# Altium PCB usb_c_meter.PcbDoc
Units mm, origin at the board's own origin, x right, y up, seen from the top; angles counter-clockwise.
Board outline 50.85 x 29.85 mm, 2 copper layers (Top Layer, Bottom Layer); 39 components, 23 nets, 172 pads, 24 vias.
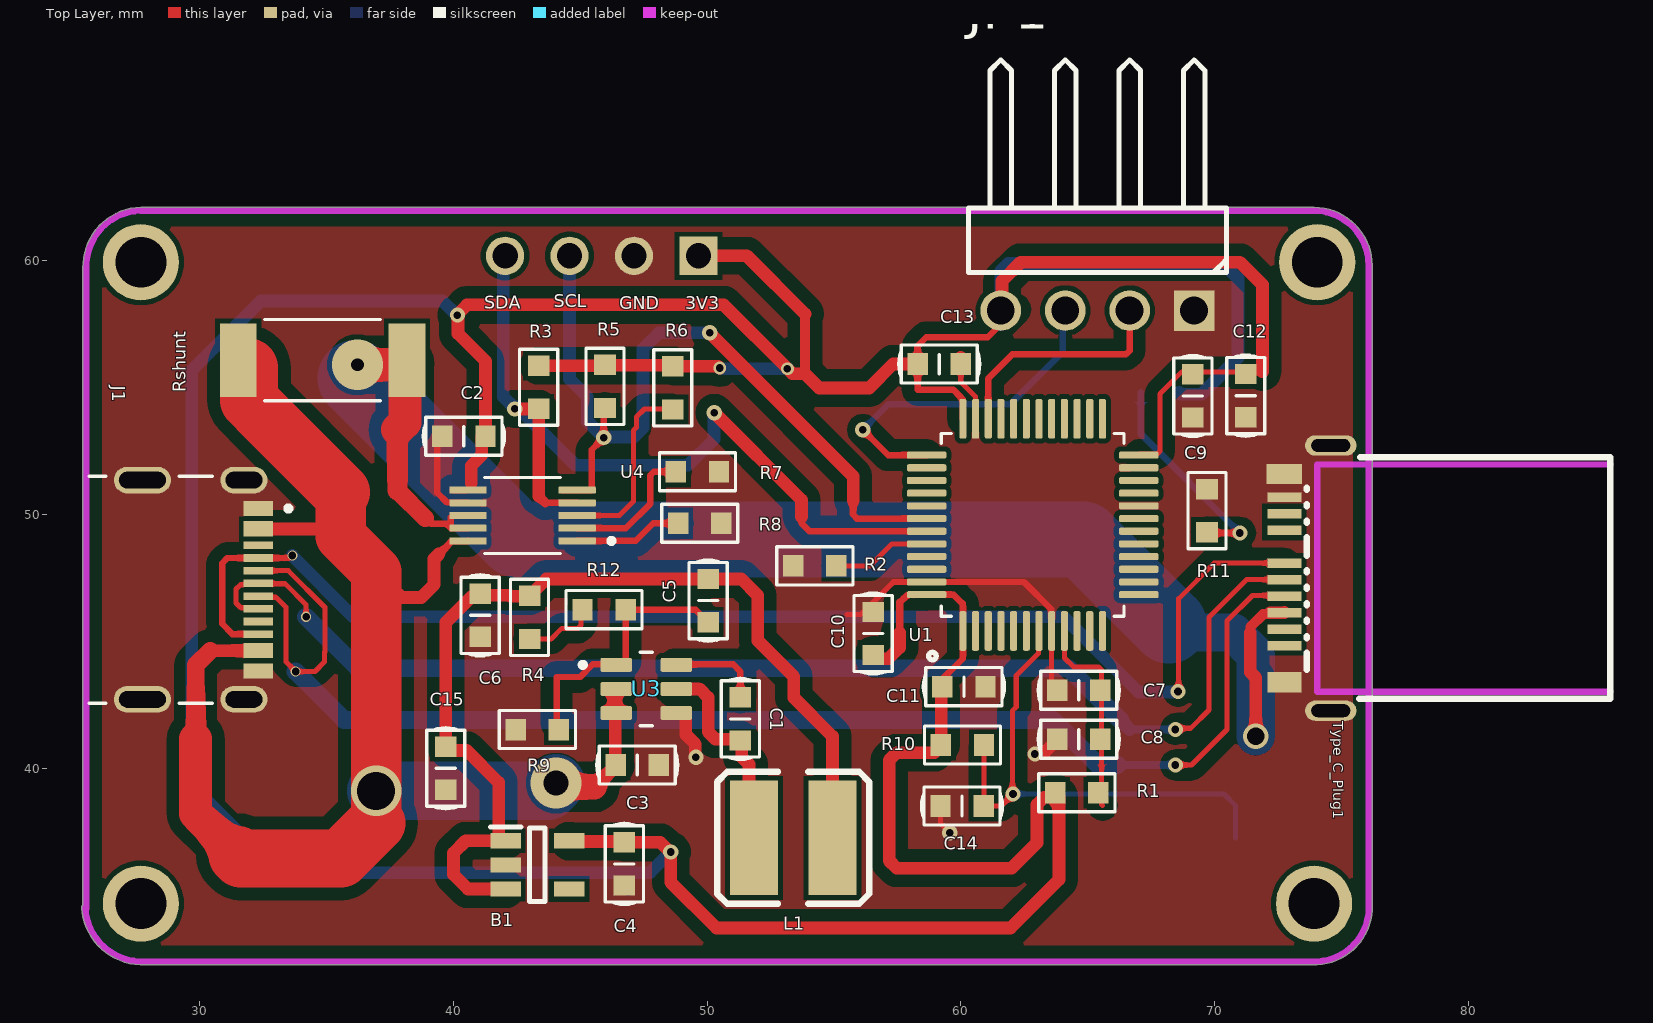
[diagram p0: Top Layer view]
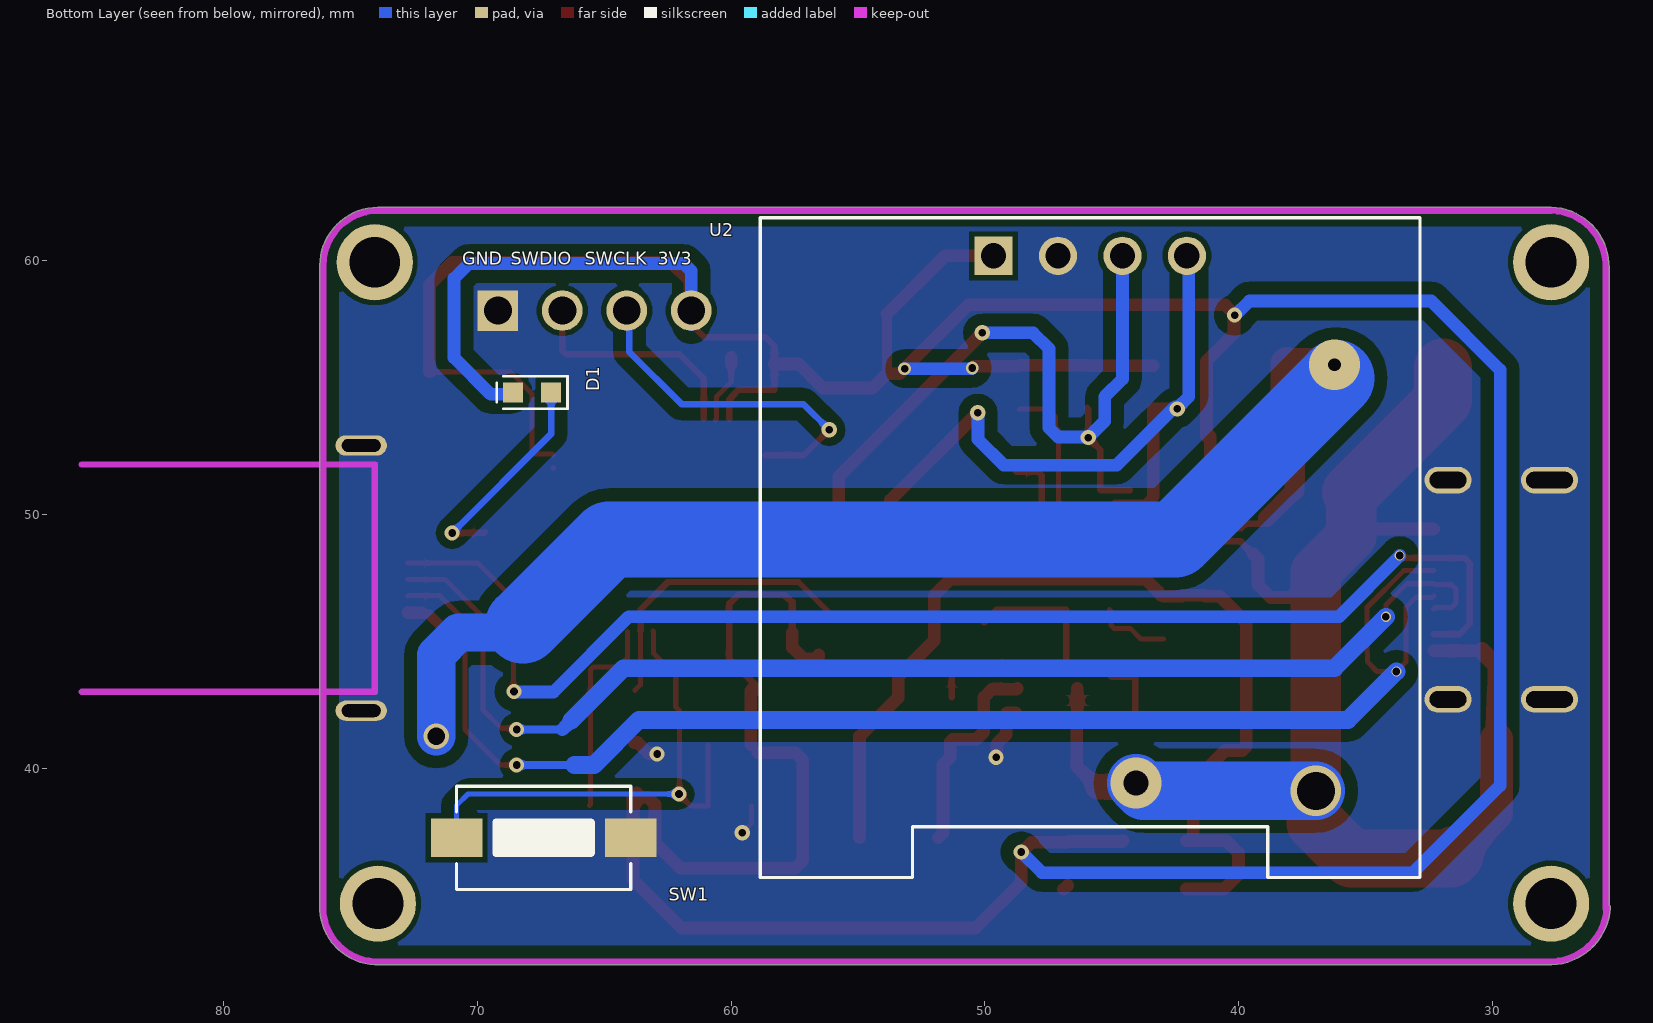
[diagram p1: Bottom Layer view, seen from below]
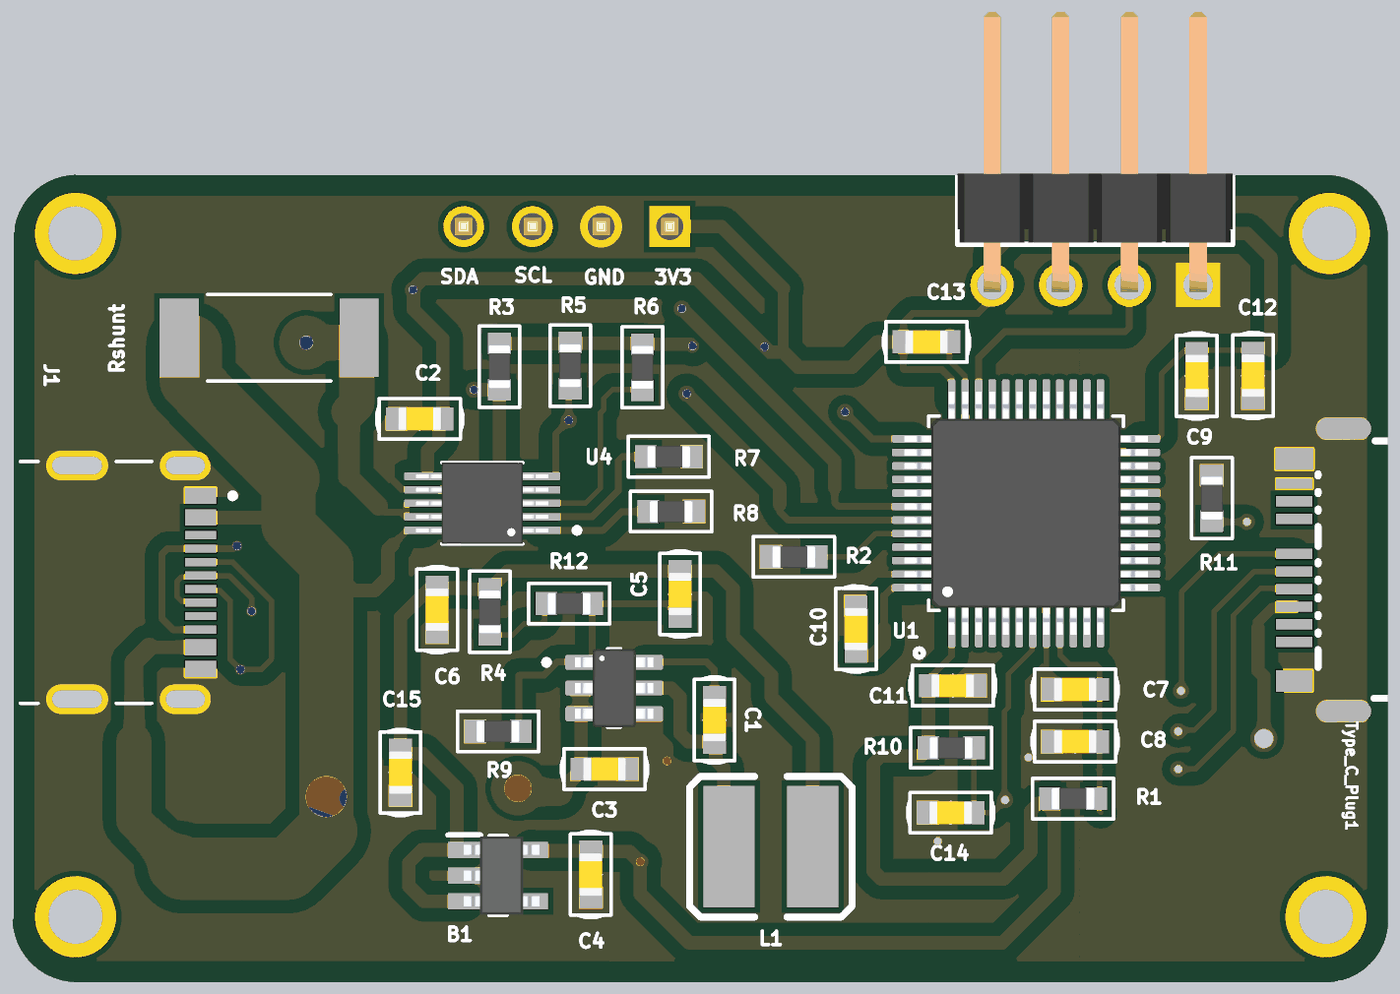
[diagram p2: 3D render of the assembled board from above, using the file's embedded part models]
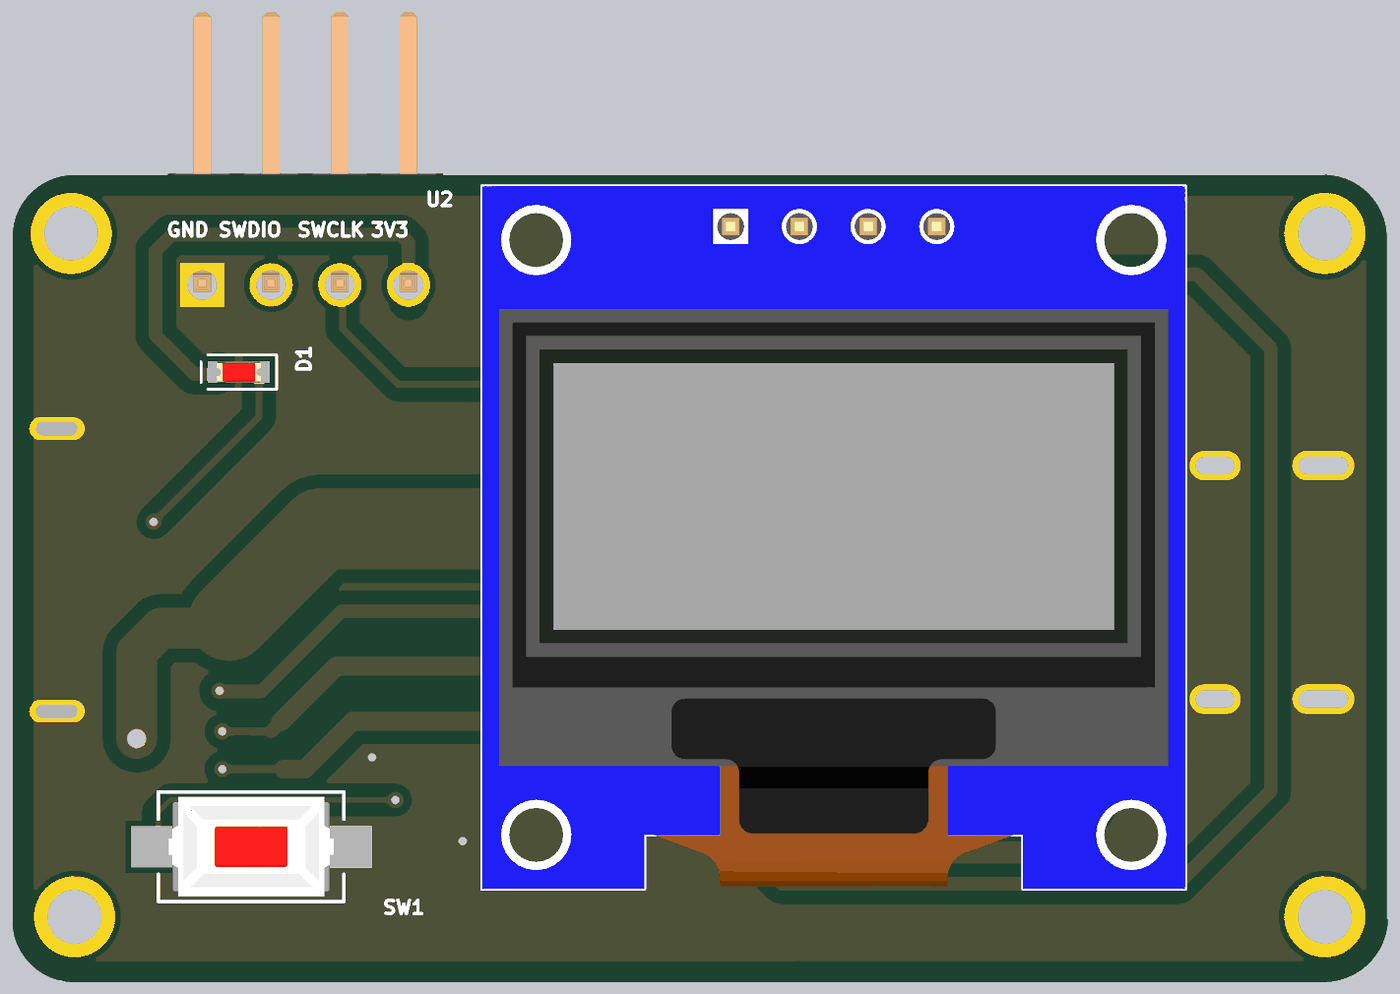
[diagram p3: 3D render of the assembled board from below, using the file's embedded part models]

## Layer stack, top to bottom
Top Solder: solder mask 0.0102, Solder Resist, Dk 3.5
Top Layer: signal copper 0.0356
Dielectric 1: dielectric 0.32, FR-4, Dk 4.8
Bottom Layer: signal copper 0.0356
Bottom Solder: solder mask 0.0102, Solder Resist, Dk 3.5

## Board outline
25.36,34.49 cw(c25.484,34.516) 25.4,34.611 25.4,59.69 25.401,59.71 cw(c27.746,59.766) 27.682,62.11 27.728,62.103 73.913,62.103 cw(c73.913,59.816) 76.2,59.816 76.2,34.458 76.207,34.409 cw(c73.921,34.544) 74.048,32.258 74.041,32.258 27.659,32.259 27.655,32.259 cw(c27.736,34.639)

## Design rules (kind name [scope] priority, off if disabled: settings)
BoardOutlineClearance [All] p1 off: gap=0.254 ignorepadtopadclearanceinfootprint=FALSE except(0: Arc-SplitContinuation Track-SplitContinuation SMDPad-SplitContinuation THPad-SplitContinuation Via-SplitContinuation Fill-SplitContinuation Poly-SplitContinuation Region-SplitContinuation Text-SplitContinuation)
Clearance Clearance_3 [InPolygon And InNet('GND') vs InComponent('U1')] p1: gap=0.2 ignorepadtopadclearanceinfootprint=FALSE
Clearance Clearance_2 [InPolygon And InNet('GND') vs InNet('3V3') And Not IsPad] p2: gap=0.5 ignorepadtopadclearanceinfootprint=FALSE
Clearance Clearance_1 [InPolygon And InNet('GND') vs InNet('+5') And Not IsPad] p3: gap=0.5 ignorepadtopadclearanceinfootprint=FALSE
Clearance [All] p4: gap=0.2 ignorepadtopadclearanceinfootprint=FALSE except(0.5: Track-Poly)
DiffPairsRouting [All] p1: maxlimit=0.6 minlimit=0.2 mostfreqgap=0.4 toplayer_minwidth=0.2 toplayer_maxwidth=0.2 toplayer_prefwidth=0.2 bottomlayer_minwidth=0.2 bottomlayer_maxwidth=0.2 bottomlayer_prefwidth=0.2 maxuncoupledlength=12.7
MinimumSolderMaskSliver [All] p1: minsoldermaskwidth=0.015
PlaneConnect [All] p1: planeconnectstyle=Direct reliefexpansion=0.508 reliefentries=4 reliefconductorwidth=0.254 reliefairgap=0.254
PolygonConnect [All] p1: connectstyle=Direct reliefconductorwidth=0.254 reliefentries=4 polygonreliefangle="90 Angle" airgapwidth=0.254
RoutingVias [All] p1: holewidth=0.3 width=0.6 viastyle="Through Hole" minholewidth=0.3 minwidth=0.6 maxholewidth=0.3 maxwidth=0.6
SilkToSolderMaskClearance [IsPad] p1: minsilkscreentomaskgap=0.1 clearancetoexposedcopper=TRUE
SolderMaskExpansion [All] p1: expansion=0.02 istentingtop=FALSE
Width signal [All] p1 off: maxlimit=0.5 minlimit=0.2 preferedwidth=0.35 minimp=50.000000 maximp=50.000000 favimp=50.000000
Width [All] p2 off: maxlimit=0.5 minlimit=0.2 preferedwidth=0.253 minimp=50.000000 maximp=50.000000 favimp=50.000000
Width bus [All] p3: maxlimit=3 minlimit=0.2 preferedwidth=1.3 minimp=50.000000 maximp=50.000000 favimp=50.000000
26 further rules are at their usual default settings.

## Components (designator, comment, footprint, x,y, rotation, side; value= is the part's Value field where it differs from the comment)
B1 "MIC5219-3.3YM5-TR" SOT95P280X145-5N 43.307,36.195 r0 top
C1 "100nF" "C 0603" 51.308,41.949 r270 top
C2 "104" "C 0603" 40.411,53.086 r180 top
C3 "10uF" "C 0603" 47.244,40.132 r0 top
C4 "2.2nF" "C 0603" 46.736,36.234 r270 top
C5 "100pF" "C 0603" 50.038,46.609 r270 top
C6 "22uF" "C 0603" 41.055,46.03 r270 top
C7 "100nF" "C 0603" 64.643,43.078 r180 top
C8 "1nF" "C 0603" 64.643,41.148 r180 top
C9 "100nF" "C 0603" 69.139,54.674 r90 top
C10 "100nF" "C 0603" 56.54,45.314 r90 top
C11 "100nF" "C 0603" 60.118,43.221 r0 top
C12 "100nF" "C 0603" 71.222,54.686 r270 top
C13 "10nF" "C 0603" 59.147,55.933 r0 top
C14 "100nF" "C 0603" 60.044,38.517 r180 top
C15 "22uF" "C 0603" 39.7,40.005 r270 top
D1 "Led" "Led 0603 - red" 67.843,54.813 r180 bottom
J1 "GT-USB-7010B" G-SWITCH_GT-USB-7010B 27.746,47.039 r270 top
JP1 "JP 1x4 2.54" "JP 1x4 DC" 60.3,60.579 r180 top
L1 "CD43-10uH" IND-SMD_L4.5-W4.0 53.391,37.262 r0 top
R1 "0" "R 0603" 64.567,39.04 r180 top
R2 "10K" "R 0603" 54.243,47.981 r0 top
R3 "10K" "R 0603" 43.358,55.016 r270 top
R4 "100K" "R 0603" 43.002,45.949 r90 top
R5 "10K" "R 0603" 45.974,55.054 r270 top
R6 "10K" "R 0603" 48.643,54.993 r270 top
R7 "10K" "R 0603" 49.618,51.689 r180 top
R8 "10K" "R 0603" 49.706,49.657 r180 top
R9 "30k" "R 0603" 43.307,41.529 r0 top
R10 "10k" "R 0603" 60.059,40.919 r180 top
R11 "1K" "R 0603" 69.698,50.153 r90 top
R12 "51K" "R 0603" 45.937,46.253 r180 top
Rshunt "0.01" RES_ERJU1TF4700U 34.846,56.083 r180 top
SW1 "Button" SW/2/SMD 67.386,37.262 r180 bottom
Type_C_Plug1 "GT-USB-8016A" USB-TYPE-C-SMD_GT-USB-8016A 73.66,47.498 r90 top
U1 "STM32F103C8T6" QFP50P900X900X160-48N 62.827,49.594 r90 top
U2 "DM-OLED096-636" MODULE_DM-OLED096-636 45.847,48.698 r180 bottom
U3 "AP63201WU-7" SOP95P280X100-6N 47.6,43.129 r0 top
U4 "INA226AIDGSR" SOP50P490X110-10N 42.725,49.964 r180 top

## Footprints (in the part's own frame and the unit in brackets; to place one, negate y for a bottom-side part, rotate by r counter-clockwise, add the part's x,y. Pads: shape width x height; smd on the part's side, far side on the other; paste and mask are expansions set on the pad)
"C 0603" [mm] "Chip Capacitor, 2-Leads, Body 1.6x0.8mm, IPC Medium Density"
  rect 0.8x0.85 smd: 1(-0.85,0) 2(0.85,0)
  silkscreen extent -1.6,-0.75 1.6,0.75, body extent -0.8,-0.43 0.8,0.43, height 0.81
G-SWITCH_GT-USB-7010B [mm]
  rect 0.6x1.15 smd mask+0.05: A1_B12(-3.2,4.565) A4_B9(-2.4,4.565) B1_A12(3.2,4.565) B4_A9(2.4,4.565)
  rect 0.3x1.15 smd mask+0.05: A5(-1.25,4.565) A6(-0.25,4.565) A7(0.25,4.565) A8(1.25,4.565) B5(1.75,4.565) B6(0.75,4.565) B7(-0.75,4.565) B8(-1.75,4.565)
  oval 1.05x1.85 hole 0.65 slot 1.45 at 90 deg: SH1(-4.32,4) SH2(4.32,4)
  oval 1.05x2.25 hole 0.65 slot 1.85 at 90 deg: SH3(-4.32,0) SH4(4.32,0)
  silkscreen extent -4.47,-2.1 4.47,5.85
IND-SMD_L4.5-W4.0 [mil]
  rect 74.8x177.2 smd: 1(-61,0) 2(61,0)
  silkscreen extent -118,-102 118,102
"JP 1x4 DC" [mm] "4 pins, 1 row, right angled, gold plating"
  rect 1.6x1.6 hole 1.1: 1(-8.89,2.54)
  round 1.6 hole 1.1: 2(-6.35,2.54) 3(-3.81,2.54) 4(-1.27,2.54)
  silkscreen extent -10.16,-7.34 0,1.04, body extent -10.16,-7.57 0,2.79, height 2.54
"Led 0603 - red" [mm] "Led SMD 0603"
  rect 0.8x0.8 smd: 1(-0.75,0) 2(0.75,0)
  silkscreen extent -1.4,-0.64 1.4,0.64, body extent -0.81,-0.4 0.81,0.4, height 0.6
MODULE_DM-OLED096-636 [mm]
  rect 1.508x1.508 / inner round 1.508 / far side rect 1.508x1.508 hole 1: 1(-3.81,11.5)
  round 1.508 hole 1: 2(-1.27,11.5) 3(1.27,11.5) 4(3.81,11.5)
  round 3 hole 2: S1(-28.067,-14.027) S2(-28.194,11.246) S3(18.161,11.246) S4(18.161,-14.027)
  silkscreen extent -13,-13 13,13, body extent -13,-13 13,13, height 5.66
QFP50P900X900X160-48N [mm]
  rrect50% 1.56x0.28 smd: 1(-4.18,2.75) 2(-4.18,2.25) 3(-4.18,1.75) 4(-4.18,1.25) 5(-4.18,0.75) 6(-4.18,0.25) 7(-4.18,-0.25) 8(-4.18,-0.75) 9(-4.18,-1.25) 10(-4.18,-1.75) 11(-4.18,-2.25) 12(-4.18,-2.75) 25(4.18,-2.75) 26(4.18,-2.25) 27(4.18,-1.75) 28(4.18,-1.25) 29(4.18,-0.75) 30(4.18,-0.25) 31(4.18,0.25) 32(4.18,0.75) 33(4.18,1.25) 34(4.18,1.75) 35(4.18,2.25) 36(4.18,2.75)
  rrect50% 0.28x1.56 smd: 13(-2.75,-4.18) 14(-2.25,-4.18) 15(-1.75,-4.18) 16(-1.25,-4.18) 17(-0.75,-4.18) 18(-0.25,-4.18) 19(0.25,-4.18) 20(0.75,-4.18) 21(1.25,-4.18) 22(1.75,-4.18) 23(2.25,-4.18) 24(2.75,-4.18) 37(2.75,4.18) 38(2.25,4.18) 39(1.75,4.18) 40(1.25,4.18) 41(0.75,4.18) 42(0.25,4.18) 43(-0.25,4.18) 44(-0.75,4.18) 45(-1.25,4.18) 46(-1.75,4.18) 47(-2.25,4.18) 48(-2.75,4.18)
  silkscreen extent -5.32,-3.6 3.6,4.1, body extent -4.5,-4.5 4.5,4.5, height 1.6
"R 0603" [mm] "Chip Resistor, 2-Leads, Body 1.6x0.8mm, IPC Medium Density"
  rect 0.8x0.85 smd: 1(-0.85,0) 2(0.85,0)
  silkscreen extent -1.5,-0.75 1.5,0.75, body extent -0.8,-0.4 0.8,0.4, height 0.5
RES_ERJU1TF4700U [mm]
  rect 1.45x2.9 smd: 1(-3.325,0) 2(3.325,0)
  silkscreen extent -2.28,-1.6 2.28,1.6
SOP50P490X110-10N [mm]
  rrect25% 1.47x0.28 smd: 1(-2.15,1) 2(-2.15,0.5) 3(-2.15,0) 4(-2.15,-0.5) 5(-2.15,-1) 6(2.15,-1) 7(2.15,-0.5) 8(2.15,0) 9(2.15,0.5) 10(2.15,1)
  silkscreen extent -3.6,-1.5 1.5,1.5, body extent -2.45,-1.5 2.45,1.5, height 1.1
SOP95P280X100-6N [mm]
  rrect25% 1.24x0.55 smd: 1(-1.185,0.95) 2(-1.185,0) 3(-1.185,-0.95) 4(1.185,-0.95) 5(1.185,0) 6(1.185,0.95)
  silkscreen extent -2.6,-1.45 0.25,1.45, body extent -1.45,-1.45 1.45,1.45, height 1
SOT95P280X145-5N [mm]
  rect 1.2x0.6 smd: 1(-1.25,0.95) 2(-1.25,0) 3(-1.25,-0.95) 4(1.25,-0.95) 5(1.25,0.95)
  silkscreen extent -1.85,-1.45 0.3,1.5, body extent -1.27,-1.45 1.53,1.45, height 1.45
SW/2/SMD [mil]
  rect 80x60 smd: 1(-135,0) 2(135,0)
  silkscreen extent -135,-80 135,80, body extent -120,-73 120,73, height 98
USB-TYPE-C-SMD_GT-USB-8016A [mm]
  rect 0.8x1.34 smd paste-100 mask+0.051: 1(-4.1,0.915)
  rect 0.8x1.4 smd paste-100 mask+0.051: 2(4.1,0.915)
  oval 0.8x2.03 hole 0.5 slot 1.53 at 90 deg: 3(-5.225,-0.915) 4(5.225,-0.915)
  rect 0.38x1.34 smd paste-100 mask+0.051: A1(3.19,0.915) A2(2.54,0.915) A3(1.89,0.915) A5(0.59,0.915) A6(-0.06,0.915) A7(-0.71,0.915) A9(-1.36,0.915) B10(-2.66,0.915) B11(-2.01,0.915)
  Keep-Out Layer lines w0.254: -4.475,-0.375 -4.475,-11.925 -4.475,-0.375 ; -4.475,-0.375 4.475,-0.375 ; -4.475,-0.375 4.475,-0.375 ; 4.475,-0.375 4.475,-11.925 4.475,-0.375
  silkscreen extent -4.75,-11.92 4.77,0.04

## Part data
B1: "LDO Regulator Pos 3.3V 0.5A Microchip MIC5219-3.3YM5-TR, LDO Voltage Regulator, 500mA, 3.3 V +/-2%, 2.5  12 Vin, 5-Pin SOT-23", Manufacturer_Name=Microchip, Mouser Part Number=998-MIC5219-3.3YM5TR, Arrow Part Number=MIC5219-3.3YM5-TR, Arrow Price/Stock=https://www.arrow.com/en/products/mic5219-3.3ym5-tr/microchip-technology?utm_currency=USD&region=nac, Datasheet Link=http://www.microchip.com/mymicrochip/filehandler.aspx?ddocname=en579712, Geometry.Height=1.45mm, Manufacturer_Part_Number=MIC5219-3.3YM5-TR, Mouser Price/Stock=https://www.mouser.co.uk/ProductDetail/Microchip-Technology/MIC5219-3.3YM5-TR?qs=U6T8BxXiZAWojkIJMtSJlw%3D%3D
C1 C2 C3 C4 C5 C6 C7 C8 C9 C10 C11 C12 C13 C14 C15: library part "Capacitor NP", "Capacitor non-pol"
D1: "Typical LED"
J1: "Horizontal Type-C 16P Female SMT", Package=None, Check_prices=https://www.snapeda.com/parts/GT-USB-7010B/G-switch/view-part/?ref=eda, MF=G-switch, MP=GT-USB-7010B, SnapEDA_Link=https://www.snapeda.com/parts/GT-USB-7010B/G-switch/view-part/?ref=snap
JP1: library part "JP 1x4 2.54 Duc Cong", "Cắm", Chung_Loai=Cắm, Don_Vi=Con, Ma_Hang=MH000904, Ten_Linh_Kien="Jump Đơn Đực 2.54MM 1x40P Cong Đứng"
L1: JLCPCB Part Class="Extended Part", AddInBom=yes, ConvertToPcb=yes, Device=CD43-10uH, FootprintName=IND-SMD_L4.5-W4.0, LCSC Part Name=CD43-10uH, ManufacturerPart=CD43-10uH, ModelId=fc5e8c13a5db48cc9753193df7da3342ÂŽ0819f05c4eef4c71ace90d822a990e87, ModelName=IND-SMD_L4.5-W4.0-H3.2, ModelTransform=157.48,170.221,0,90,0,0,0,-0.591,0, Supplier=LCSC, Supplier Footprint=IND-SMD_L4.5-W4.0, SupplierPart=C9900008796, Symbol=CD43-10UH
R1 R2 R3 R4 R5 R6 R7 R8 R9 R10 R11 R12: library part Resistor, "Resistor"
Rshunt: library part ERJU1TF4700U, Package=None, Availability=Unavailable, MP=ERJU1TF4700U, Price=None
SW1: library part "SW SPST", "Tact switch 2 pin"
Type_C_Plug1: Current Rating-Power=-, Detection color=Black, JLCPCB Part Class="Extended Part", LCSC Part Name="Type-C 公 沉板", Manufacturer=G-Switch(品赞), Operating Temperature=-40℃~+85℃, Add into BOM=yes, Center Height=0.15mm, Connect-Disconnect Life=-, Connector Type=Type-C, Convert to PCB=yes, Datasheet=https://item.szlcsc.com/datasheet/GT-USB-8016A/3445597.html, Device=GT-USB-8016A, Gender=Male, Length=12mm, Manufacturer Part=GT-USB-8016A, Mounting Type="Laminated board", Number of Contacts=9P, Number of Ports=1, Protocol Standard="USB 2.0", Supplier=LCSC, Supplier Footprint=SMD, Supplier Part=C2988371, Symbol=GT-USB-8016A, Voltage Rating=-
U1: "ARM® Cortex®-M3 STM32F1 Microcontroller IC 32-Bit 72MHz 64KB (64K x 8) FLASH 48-LQFP (7x7)", Package="LQFP-48 STMicroelectronics", Check_prices=https://www.snapeda.com/parts/STM32F103C8T6/STMicroelectronics/view-part/?ref=eda, MF=STMicroelectronics, MP=STM32F103C8T6, SnapEDA_Link=https://www.snapeda.com/parts/STM32F103C8T6/STMicroelectronics/view-part/?ref=snap
U2: "0.96â€ 128 X 64 MONOCHROME GRAPHIC OLED DISPLAY MODULE - I2C", Package=Package, Check_prices=https://www.snapeda.com/parts/DM-OLED096-636/Display+Module/view-part/?ref=eda, MF="Display Module", MP=DM-OLED096-636, SnapEDA_Link=https://www.snapeda.com/parts/DM-OLED096-636/Display+Module/view-part/?ref=snap
U3: Package=None, Availability=Unavailable, MP=AP63201WU-7, Price=None
U4: "36V, 16-bit, ultra-precise i2c output current/voltage/power monitor w/alert", Package="VSSOP-10 Texas Instruments", Check_prices=https://www.snapeda.com/parts/INA226AIDGSR/Texas+Instruments/view-part/?ref=eda, MF="Texas Instruments", MP=INA226AIDGSR, SnapEDA_Link=https://www.snapeda.com/parts/INA226AIDGSR/Texas+Instruments/view-part/?ref=snap

## Via types
v1: diameter 0.6/0.6 (per signal layer), hole 0.3, Top Layer to Bottom Layer, tented both sides, 13 vias
v2: diameter 0.4/0.4 (per signal layer), hole 0.3, Top Layer to Bottom Layer, tented both sides, 3 vias
v3: diameter 0.6, hole 0.3, Top Layer to Bottom Layer, tented both sides, 2 vias
v4: diameter 0.5/0.5 (per signal layer), hole 0.3, Top Layer to Bottom Layer, tented both sides, 2 vias
v5: diameter 2/2 (per signal layer), hole 0.5, Top Layer to Bottom Layer, tented both sides, 1 vias
v6: diameter 2/2 (per signal layer), hole 1, Top Layer to Bottom Layer, tented both sides, 1 vias
v7: diameter 2/2 (per signal layer), hole 1.5, Top Layer to Bottom Layer, tented both sides, 1 vias
v8: diameter 1/1 (per signal layer), hole 0.7, Top Layer to Bottom Layer, tented both sides, 1 vias

## Nets (pads, with @x,y where several pads share a name; then routed paths per layer and width w, separated by ;. In a path a pad name is that pad's centre, name@x,y a point inside that pad or via, vN(x,y) a via of type N, cw(c..) or ccw(c..) an arc to the next point about the centre after c; other vN are vias at no path point)
3V3: B1.5 C2.1 C4.1 C9.2 C10.1 C11.1 C12.1 C13.1 D1.1 JP1.4 R1.2 R3.1 R5.1 R6.1 R10.2 U1.1 U1.24 U1.36 U1.48 U2.1 U4.6 | length 196.7
  Top Layer w0.2: U4.6 40.659,50.964 40.699,51.004 40.699,51.24 ; R10.2 R10.2@59.219,40.93 ; U1.24 67.047,52.384 67.724,52.384 67.841,52.501 67.841,54.76 68.707,55.626 71.882,55.626
  Top Layer w0.253: U4.6@39.98,50.964 U4.6@40.513,50.964 ; 57.584,46.535 57.879,46.83 58.633,46.83 U1.48 59.709,46.844 60.075,46.478 ; U1.1 60.077,46.476
  Top Layer w0.254: C11.1@59.021,43.265 60.077,44.321 U1.1 ; C11.1@59.092,43.045 C11.1 ; U1.36@60.072,53.774 60.072,54.549 59.704,54.917 58.297,54.917 C13.1 58.297,56.646 58.639,56.988 61.052,56.988 JP1.4@62.149,58.085 ; 60.075,46.501 60.075,46.478 60.077,46.476
  Top Layer w0.3: 57.584,45.339 57.584,46.535
  Top Layer w0.4: 53.855,55.552 53.855,57.905
  Top Layer w0.5: 40.699,51.24 40.699,51.922 41.119,52.343 C2.1@41.119,53.082 ; C2.1 41.261,56.046 40.178,57.129 40.178,57.842 v1(40.159,57.861) 40.159,57.888 40.534,58.264 50.652,58.264 v4(53.162,55.753) 53.363,55.552 53.855,55.552 54.416,54.991 56.388,54.991 57.33,55.933 C13.1 ; R3.1 45.898,55.866 45.913,55.882 48.643,55.882 48.682,55.843 50.431,55.843 v4(50.495,55.778) ; B1.5 44.588,37.115 46.705,37.115 C4.1 48.157,37.084 v1@48.538,36.703 ; v1(48.565,36.703) 48.565,35.509 50.368,33.706 61.951,33.706 63.867,35.622 63.867,38.89 R1.2 63.717,39.015 63.567,38.865 63.293,38.865 63,38.572 63,37.067 62.001,36.068 57.468,36.068 57.175,36.361 57.175,40.322 57.468,40.615 R10.2@58.953,40.615 ; U2.1 51.562,60.198 53.855,57.905 ; C10.1 ccw(c56.681,44.464) 56.681,44.323 57.15,44.323 57.584,44.757 57.584,45.339 ; C11.1@59.118,43.046 59.219,43.046 R10.2@59.219,40.93 ; JP1.4 61.621,58.09 61.621,59.208 62.357,59.944 70.993,59.944 71.882,59.055 71.882,55.626
  Bottom Layer w0.5: v1(40.159,57.861) 40.132,57.861 39.573,58.42 32.41,58.42 29.693,55.702 29.693,39.319 33.122,35.89 47.752,35.89 v1(48.565,36.703) ; v4(50.495,55.778) 50.521,55.753 v4(53.162,55.753) ; JP1.4@61.57,57.476 JP1.4 61.57,59.6 61.862,59.893 70.333,59.893 70.917,59.309 70.917,56.185 69.469,54.737 68.67,54.737 D1.1
+5: B1.1 B1.3 C5.1 C6.1 C15.1 L1.2 R4.2 | length 39.3
  Top Layer w0.5: B1.3 40.574,35.245 40.005,35.814 40.005,36.664 40.486,37.145 B1.1@41.833,37.145 ; B1.1 B1.1@41.833,37.145 ; R4.2@42.951,46.787 42.251,46.787 42.211,46.826 41.355,46.826 41.315,46.787 40.742,46.787 39.7,45.745 C15.1 39.85,40.705 40.524,40.705 41.783,39.446 41.783,37.195 B1.1@41.833,37.145 ; R4.2 43.027,46.799 43.177,46.949 43.177,46.974 43.663,47.459 C5.1 51.347,47.459 51.994,46.812 51.994,45.034 53.412,43.616 53.412,42.79 54.94,41.262 L1.2
A0: R7.2 U4.2 | length 5.5
  Top Layer w0.253: U4.2 46.797,49.464 47.752,50.419 47.752,51.541 47.9,51.689 R7.2
A1: R8.2 U4.1 | length 4.3
  Top Layer w0.253: U4.1 47.186,48.964 47.879,49.657 R8.2
ALERT: R6.2 U4.3 | length 7.4
  Top Layer w0.2: U4.3 46.535,49.964 47.09,50.519 47.09,53.313 47.209,53.432 47.209,53.843 47.531,54.165 48.621,54.165 R6.2
CC1: J1.A5 J1.B5 Type_C_Plug1.A5 | length 52.6
  Top Layer w0.2: v1(68.555,43.028) 68.555,43.243 68.58,43.269 68.58,46.684 69.984,48.088 Type_C_Plug1.A5
  Top Layer w0.253: J1.B5 31.292,45.289 30.886,45.695 30.886,48.082 31.093,48.289 J1.A5 33.517,48.289 33.615,48.387 v2(33.655,48.387)
  Bottom Layer w0.253: 63.908,45.974 64.035,45.974
  Bottom Layer w0.5: v2(33.655,48.387) 33.655,48.361 36.042,45.974 64.035,45.974 67,43.009 68.536,43.009 v1(68.555,43.028)
D+: J1.A6 J1.B6 Type_C_Plug1.A6 | length 50.2
  Top Layer w0.2: J1.B6 32.261,46.339 31.612,46.339 31.436,46.515 31.436,47.063 31.612,47.239 32.261,47.239 J1.A6 32.773,47.289 32.786,47.276 33.369,47.276 34.194,46.451 v2(34.194,45.974) ; v1(68.453,41.529) 68.505,41.581 69.053,41.581 69.774,42.301 69.774,45.95 71.262,47.438 Type_C_Plug1.A6
  Bottom Layer w0.3: 66.65,41.529 v1(68.453,41.529)
  Bottom Layer w0.5: 66.294,41.885 66.65,41.529
  Bottom Layer w0.7: v2(34.194,45.974) 36.226,43.942 64.237,43.942 66.294,41.885
D-: J1.A7 J1.B7 Type_C_Plug1.A7 | length 56.4
  Top Layer w0.2: J1.A7 32.361,46.739 33.01,46.739 33.401,46.348 33.401,44.196 v2(33.782,43.815) 34.544,43.815 34.925,44.196 34.925,44.577 34.935,44.587 34.935,46.355 34.925,46.355 33.491,47.789 J1.B7 ; v1(68.453,40.132) 69.088,40.132 70.485,41.529 70.485,45.812 71.486,46.813 72.72,46.813 Type_C_Plug1.A7
  Bottom Layer w0.3: 66.168,40.133 v1(68.453,40.132) v1(68.453,40.132)
  Bottom Layer w0.7: v2(33.782,43.815) 35.687,41.91 63.627,41.91 65.405,40.132 66.167,40.132
GND: B1.2 C2.2 C3.2 C4.2 C6.2 C7.2 C8.2 C9.1 C10.2 C11.2 C12.2 C13.2 C14.2 C15.2 J1.A1_B12 J1.B1_A12 J1.SH1 J1.SH2 J1.SH3 J1.SH4 JP1.1 R2.1 R7.1 R8.1 R9.1 R11.2 SW1.2 Type_C_Plug1.1 Type_C_Plug1.2 Type_C_Plug1.3 Type_C_Plug1.4 Type_C_Plug1.A1 U1.8 U1.20 U1.23 U1.35 U1.47 U2.2 U3.4 U4.7 | length 23.5
  Top Layer w0.2: 55.514,46.062 56.061,46.062 57.343,47.344 ; C14.2 59.194,37.834 v3(59.563,37.465) ; C13.2 59.997,55.228 60.577,54.648 U1.35 ; U1.35 U1.35@60.615,53.735 ; U1.8 63.577,43.295 C7.2 ; U1.23@66.994,51.856 U1.23
  Top Layer w0.25: C2.2 39.37,52.895 39.37,50.855 39.746,50.479 40.56,50.479 U4.7 ; 57.343,47.344 U1.47 62.486,47.344 63.562,46.268 63.562,45.429 U1.8
  Top Layer w0.5: C4.2 46.886,35.234 C4.2@46.911,35.234 ; U3.4 49.13,42.179 49.155,42.154 49.155,41.334 49.536,40.953 49.536,40.456 v1(49.555,40.437) ; C13.2 C13.2@59.997,56.187 ; v3(62.916,40.564) 62.935,40.583 63.253,40.583 63.691,41.021 C8.2@63.818,41.021
NetC1_1: C1.1 U3.6 | length 3.7
  Top Layer w0.253: U3.6@48.725,44.097 51.026,44.097 51.308,43.815 C1.1
NetC1_2: C1.2 L1.1 U3.5 | length 8.3
  Top Layer w0.5: U3.5@48.725,43.147 48.75,43.122 49.715,43.122 50.038,42.799 50.038,41.441 50.331,41.148 51.259,41.148 C1.2 51.359,41.048 51.359,40.45 51.652,40.157 51.652,37.452 L1.1
NetC5_2: C5.2 R9.2 R12.1 U3.1 | length 10.4
  Top Layer w0.253: R9.2@44.069,41.743 44.069,43.6 44.997,43.6 45.494,44.097 U3.1@46.415,44.097 ; U3.1@46.443,44.079 U3.1 46.638,44.079 46.787,44.228 R12.1 49.544,46.253 49.739,46.058 49.739,46.033 50.013,45.759 C5.2
NetC7_1: C7.1 C8.1 R1.1 U1.9 | length 8.1
  Top Layer w0.2: U1.9@64.085,45.392 64.085,44.352 64.442,43.995 65.429,43.995 65.546,43.878 65.546,42.852 65.546,41.021 65.546,40.566 65.546,38.573 65.585,38.534
NetD1_2: D1.2 R11.1 | length 8.5
  Top Layer w0.253: R11.1 69.725,49.276 v1(70.993,49.276)
  Bottom Layer w0.253: D1.2 67.093,53.176 v1(70.993,49.276)
NetR2_2: R2.2 U1.44 | length 3.9
  Top Layer w0.2: R2.2 56.413,47.981 57.277,48.844 U1.44
NetR4_1: R4.1 R12.2 | length 2.9
  Top Layer w0.2: R4.1@42.951,45.099 R4.1 43.854,45.099 44.272,45.517 44.907,45.517 45.036,45.646 45.036,46.203 R12.2
NRST: C14.1 R10.1 SW1.1 U1.7 | length 20.9
  Top Layer w0.2: R10.1 60.909,38.532 C14.1 61.594,38.517 62.052,38.975 v1(62.052,38.989) 62.027,39.014 62.027,42.266 62.179,42.418 62.179,43.66 63.054,44.534 63.054,45.391 U1.7
  Bottom Layer w0.2: v1(62.052,38.989) 70.368,38.989 70.815,38.542 SW1.1
SCL: R5.2 U1.42 U2.3 U4.5 | length 32.5
  Top Layer w0.253: U4.5@44.28,50.964 U4.5 45.435,50.964 45.448,50.977 45.448,52.549 45.923,53.024 v1(45.923,53.035) 45.923,54.153 R5.2 ; 55.753,50.546 55.753,49.992 55.901,49.844 U1.42
  Top Layer w0.5: v1(50.102,57.163) 55.753,51.511 55.753,50.546
  Bottom Layer w0.5: U2.3 44.577,55.347 45.28,54.644 45.28,53.679 v1(45.923,53.035) 45.942,53.054 47.111,53.054 47.473,53.416 47.473,56.54 48.095,57.163 v1(50.102,57.163)
SDA: R3.2 U1.43 U2.4 U4.4 | length 33.3
  Top Layer w0.253: 43.618,50.464 U4.4 ; 53.721,49.911 53.721,49.657 54.034,49.344 U1.43
  Top Layer w0.35: 43.36,50.722 43.618,50.464
  Top Layer w0.5: v1(42.415,54.164) R3.2@43.335,54.164 ; 43.36,50.722 R3.2@43.36,54.164 ; v1(50.279,54.013) 53.721,50.571 53.721,49.911
  Bottom Layer w0.5: U2.4 41.961,60.122 41.961,54.646 42.415,54.191 v1(42.415,54.164) ; v1@42.5,54.249 44.806,51.943 49.251,51.943 50.271,52.963 50.271,54.005 v1(50.279,54.013)
SWCLK: JP1.3 U1.37 | length 14.2
  Top Layer w0.253: v1(56.134,53.34) 57.13,52.344 U1.37
  Bottom Layer w0.253: v1(56.134,53.34) 57.15,54.356 61.955,54.356 64.008,56.409 JP1.3@64.008,58.495
SWDIO: JP1.2 U1.34 | length 9.2
  Top Layer w0.253: U1.34 61.077,55.362 62.029,56.314 66.501,56.314 66.65,56.462 JP1.2
VBUS_IN: C3.1 J1.A4_B9 J1.B4_A9 Rshunt.2 U3.2 U3.3 U4.10 | length 58.9
  Top Layer w0.253: 39.423,48.44 39.933,48.95 40.561,48.95 U4.10
  Top Layer w0.5: 30.415,44.639 J1.B4_A9 ; 45.56,39.273 46.394,40.107 C3.1 46.374,40.151 46.374,42.178 46.355,42.197 U3.2@46.355,43.147
  Top Layer w0.508: J1.A4_B9 35.27,49.439 35.56,49.149 ; 36.957,47.752 37.973,46.736 38.735,46.736 39.243,47.244 39.243,48.26 39.423,48.44
  Top Layer w0.7: 29.845,41.148 29.845,44.069 30.415,44.639
  Top Layer w1: v6(44.044,39.421) 44.191,39.273 45.56,39.273
  Top Layer w1.3: 29.845,41.148 29.845,38.227 31.496,36.576
  Top Layer w2: 35.56,50.879 35.56,49.149 36.957,47.752 36.957,37.846
  Top Layer w2.3: 31.496,36.576 31.623,36.449 35.56,36.449 36.957,37.846 ; Rshunt.2@31.946,55.783 31.946,54.509 32.353,54.102 32.353,54.086 35.56,50.879
  Bottom Layer w2.3: v7(36.957,39.116) 43.739,39.116 v6(44.044,39.421)
VBUS_OUT: Rshunt.1 Type_C_Plug1.A9 U4.8 U4.9 | length 60.6
  Top Layer w0.253: 38.887,49.86 39.116,49.632 39.726,49.632 39.893,49.464 U4.9 ; U4.9@39.904,49.54 39.904,49.888 39.98,49.964 U4.8
  Top Layer w0.4: 71.405,45.344 71.405,45.573 71.909,46.078 72.139,46.078 Type_C_Plug1.A9@72.189,46.128
  Top Layer w0.5: 71.399,45.339 71.399,43.791 71.619,43.572 v8(71.619,41.261) ; Type_C_Plug1.A9@72.189,46.128 72.735,46.128 Type_C_Plug1.A9
  Top Layer w0.7: 37.795,50.952 38.887,49.86
  Top Layer w0.8: 37.795,50.952 37.795,53.347
  Top Layer w1.3: v5(36.218,55.905) Rshunt.1@38.098,55.905 ; 37.795,53.347 38.085,53.636 38.085,55.943 Rshunt.1@38.098,55.956
  Bottom Layer w1.5: 68.199,45.638 68.492,45.345 70.74,45.345 71.619,44.466 v8(71.619,41.261)
  Bottom Layer w3: v5@36.144,55.372 42.494,49.022 64.815,49.022 68.199,45.638
pads on no net: B1.4 J1.A8 J1.B8 Type_C_Plug1.A2 Type_C_Plug1.A3 Type_C_Plug1.B10 Type_C_Plug1.B11 U1.2 U1.3 U1.4 U1.5 U1.6 U1.10 U1.11 U1.12 U1.13 U1.14 U1.15 U1.16 U1.17 U1.18 U1.19 U1.21 U1.22 U1.25 U1.26 U1.27 U1.28 U1.29 U1.30 U1.31 U1.32 U1.33 U1.38 U1.39 U1.40 U1.41 U1.45 U1.46 U2.S1 U2.S2 U2.S3 U2.S4

## Polygon pours and split planes (outlines as drawn)
GND on Bottom Layer "GND_L02_P000" (solid, remove dead copper, pour order 0): 73.914,61.849 cw(c73.914,59.817) 75.946,59.817 75.946,34.417 cw(c74.168,34.417) 74.168,32.639 27.559,32.639 cw(c27.559,34.544) 25.654,34.544 25.654,59.563 cw(c27.94,59.563) 27.94,61.849
GND on Top Layer "GND_L01_P002" (solid, remove dead copper, pour order 2): 27.178,61.773 73.66,61.773 cw(c73.66,59.233) 76.2,59.233 76.2,34.874 cw(c73.66,34.874) 73.66,32.334 28.296,32.334 cw(c28.296,34.874) 25.756,34.874 25.756,59.639 cw(c27.94,59.639) 27.94,61.824

## Keep-outs
Keep-Out Layer:
  lines w0.254: 25.486,34.515 ccw(c27.736,34.639) 27.659,32.386 74.041,32.385 ccw(c73.921,34.544) 76.08,34.417 ; 25.527,34.476 25.527,59.69 ; 25.529,59.69 cw(c27.746,59.766) 27.686,61.983 ; 27.686,61.976 73.913,61.976 cw(c73.913,59.816) 76.073,59.816 76.073,34.417

## Silkscreen, mask and mechanical layers (free items; w line width, h text height)
Top Overlay:
  text "SCL" at 43.961,58.164 h0.5
  text "SDA" at 41.218,58.113 h0.5
  text "GND" at 46.527,58.087 h0.5
  text "3V3" at 49.143,58.087 h0.5
Bottom Overlay:
  text "3V3" at 62.896,59.84 h0.5
  text "SWCLK" at 65.763,59.84 h0.5
  text "SWDIO" at 68.684,59.84 h0.5
  text "GND" at 70.589,59.84 h0.5

## Text inside footprints (layer, text, board x,y; h text height)
J1: Mechanical 13 "PCB EDGE" at 25.996,41.539 h0.5 r270